# Altium PCB ISL6236A_DEMO_PCB_V1I1.PcbDoc (part 1 of 3)
Units mm, origin at the board's own origin, x right, y up, seen from the top; angles counter-clockwise.
Board outline 50 x 50 mm, 6 copper layers (L1, L2, L3, L4, L5, L6), stack 0.816 mm thick; 41 components, 27 nets, 119 pads, 41 vias.
Unrouted connection lines stored in the file: 91.
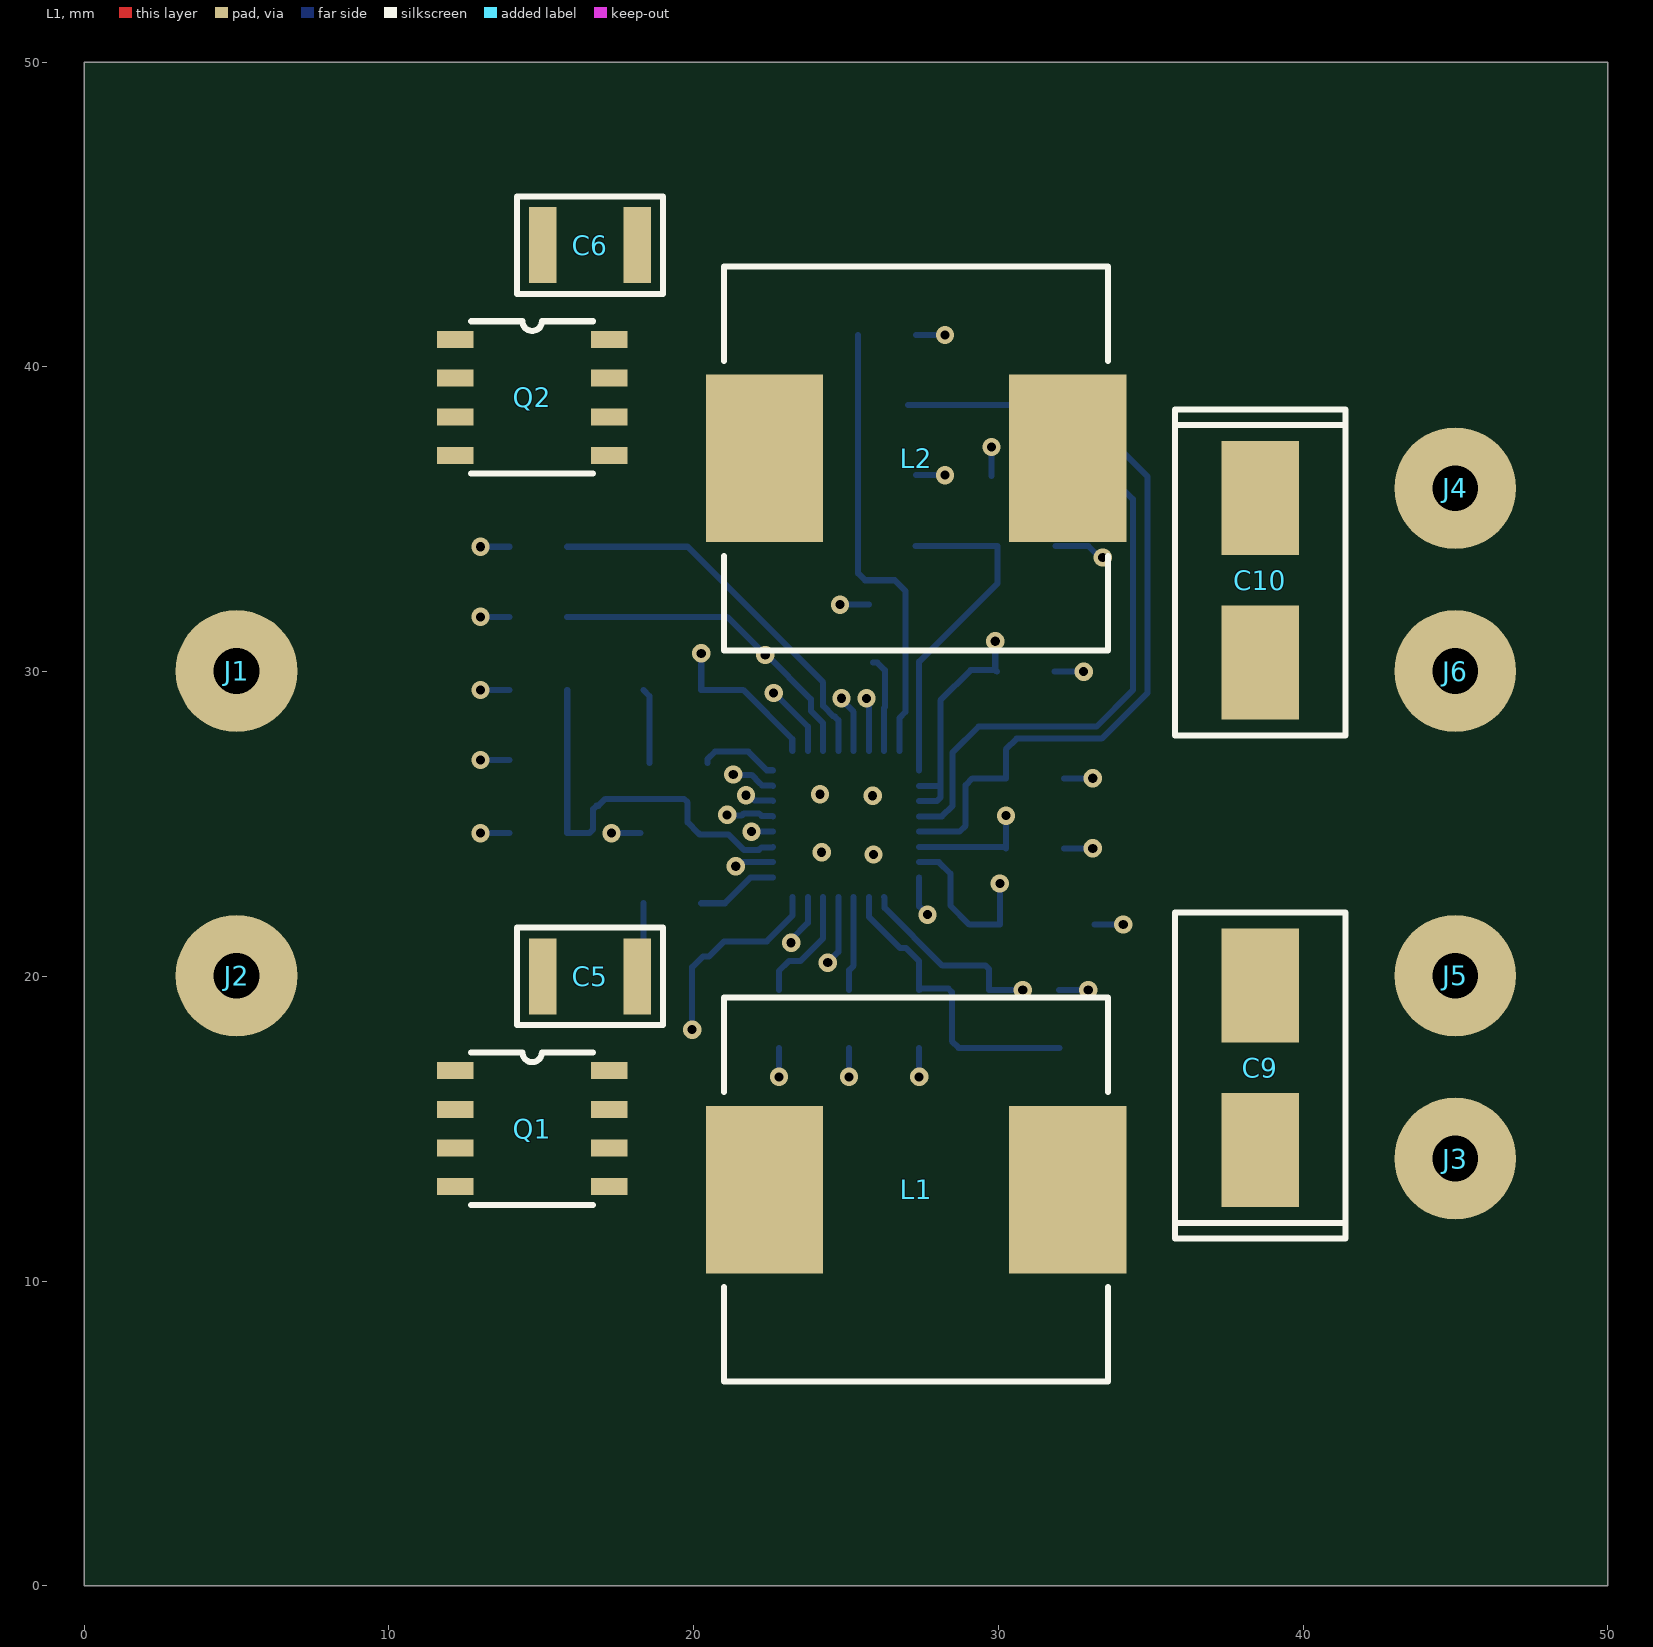
[diagram p0: L1 view]
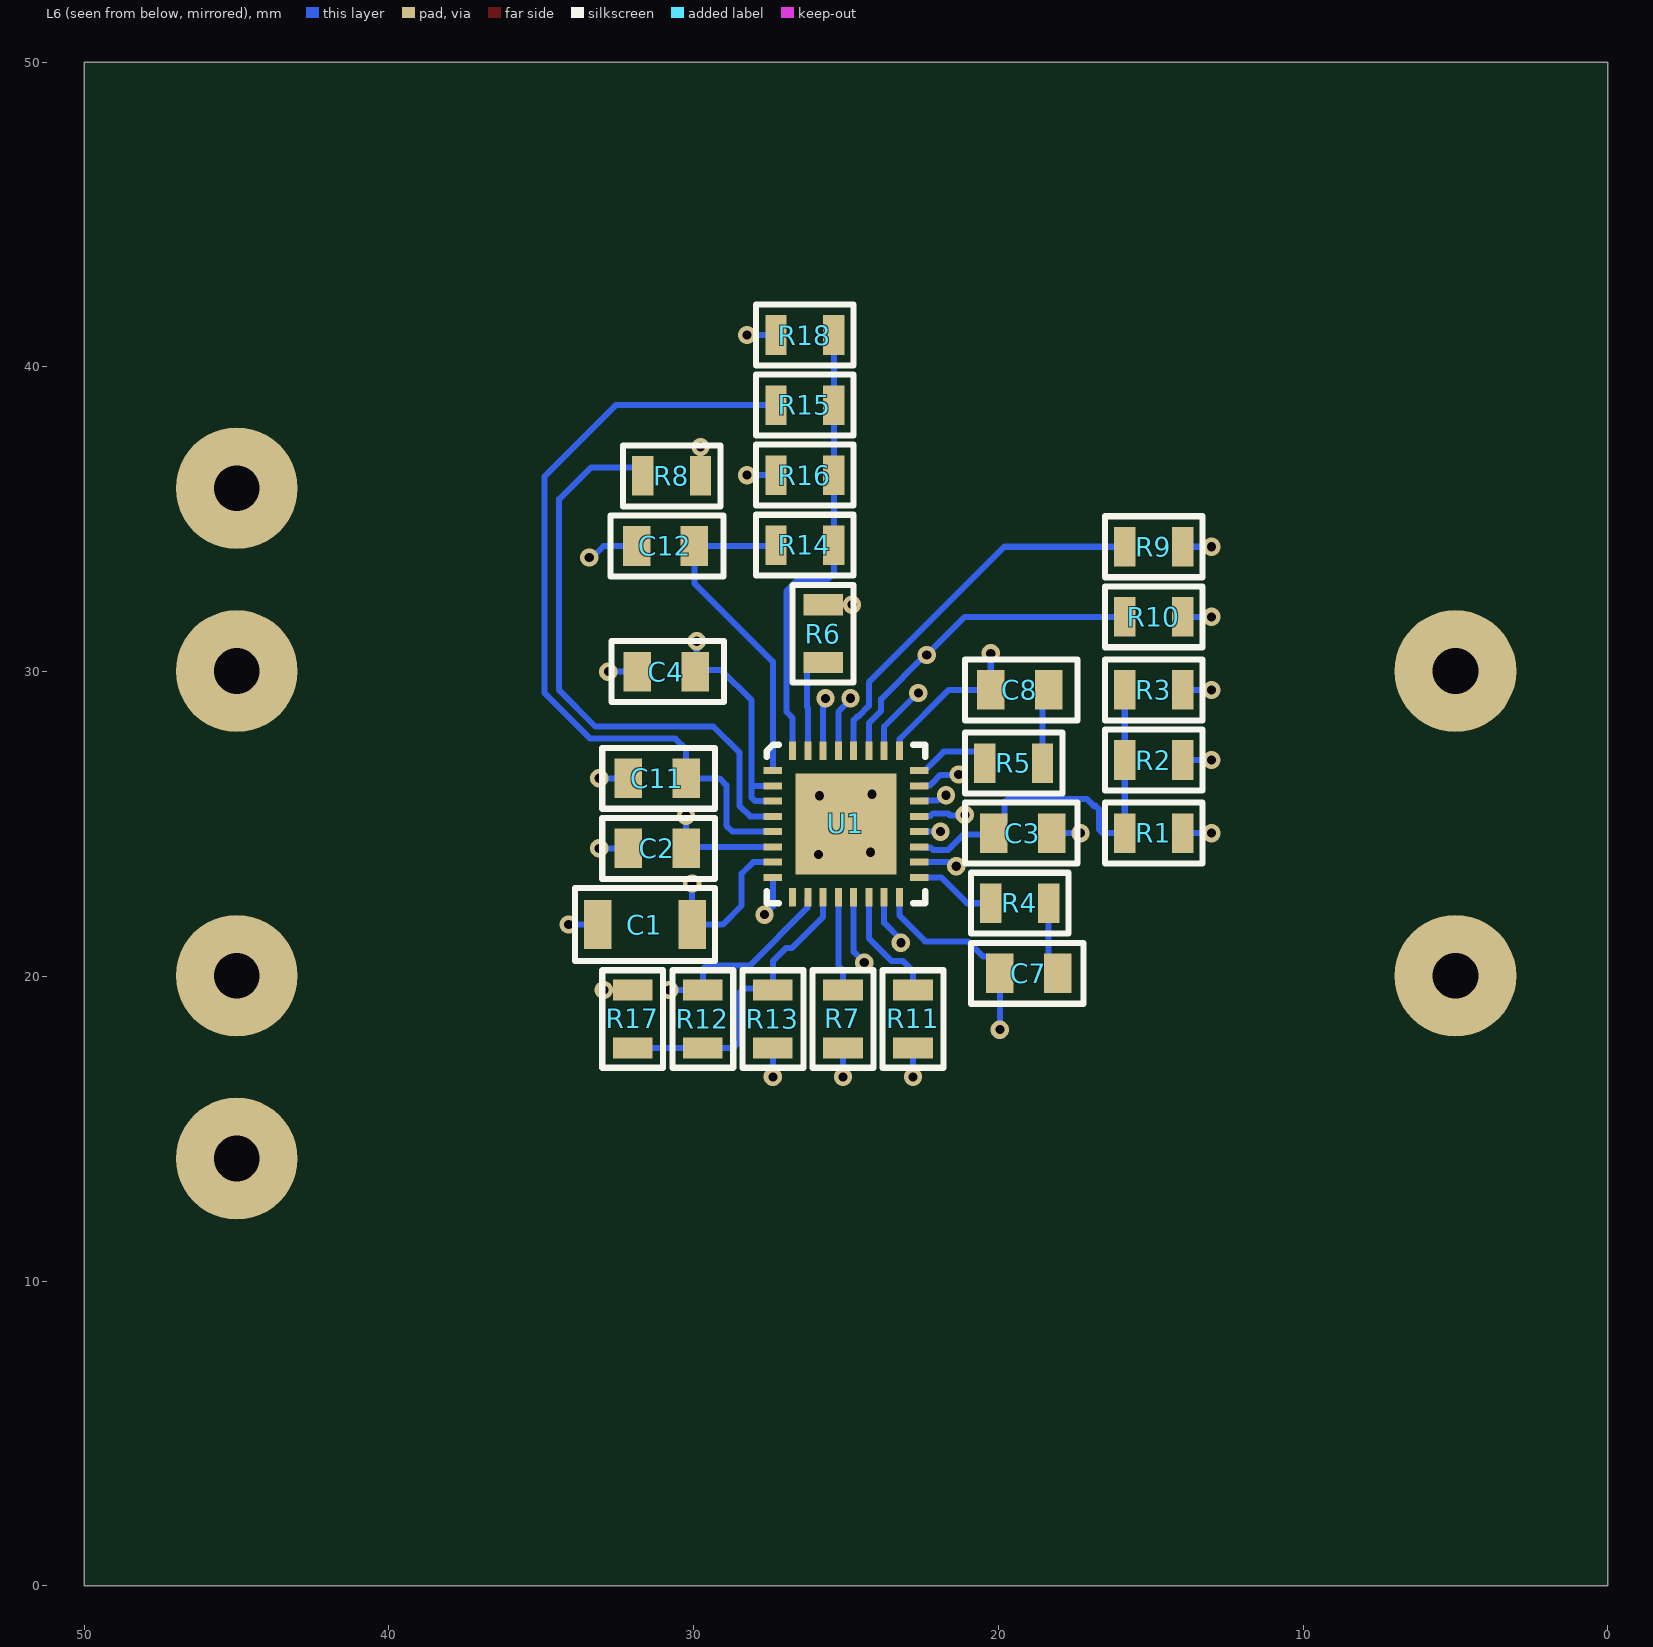
[diagram p1: L6 view, seen from below]
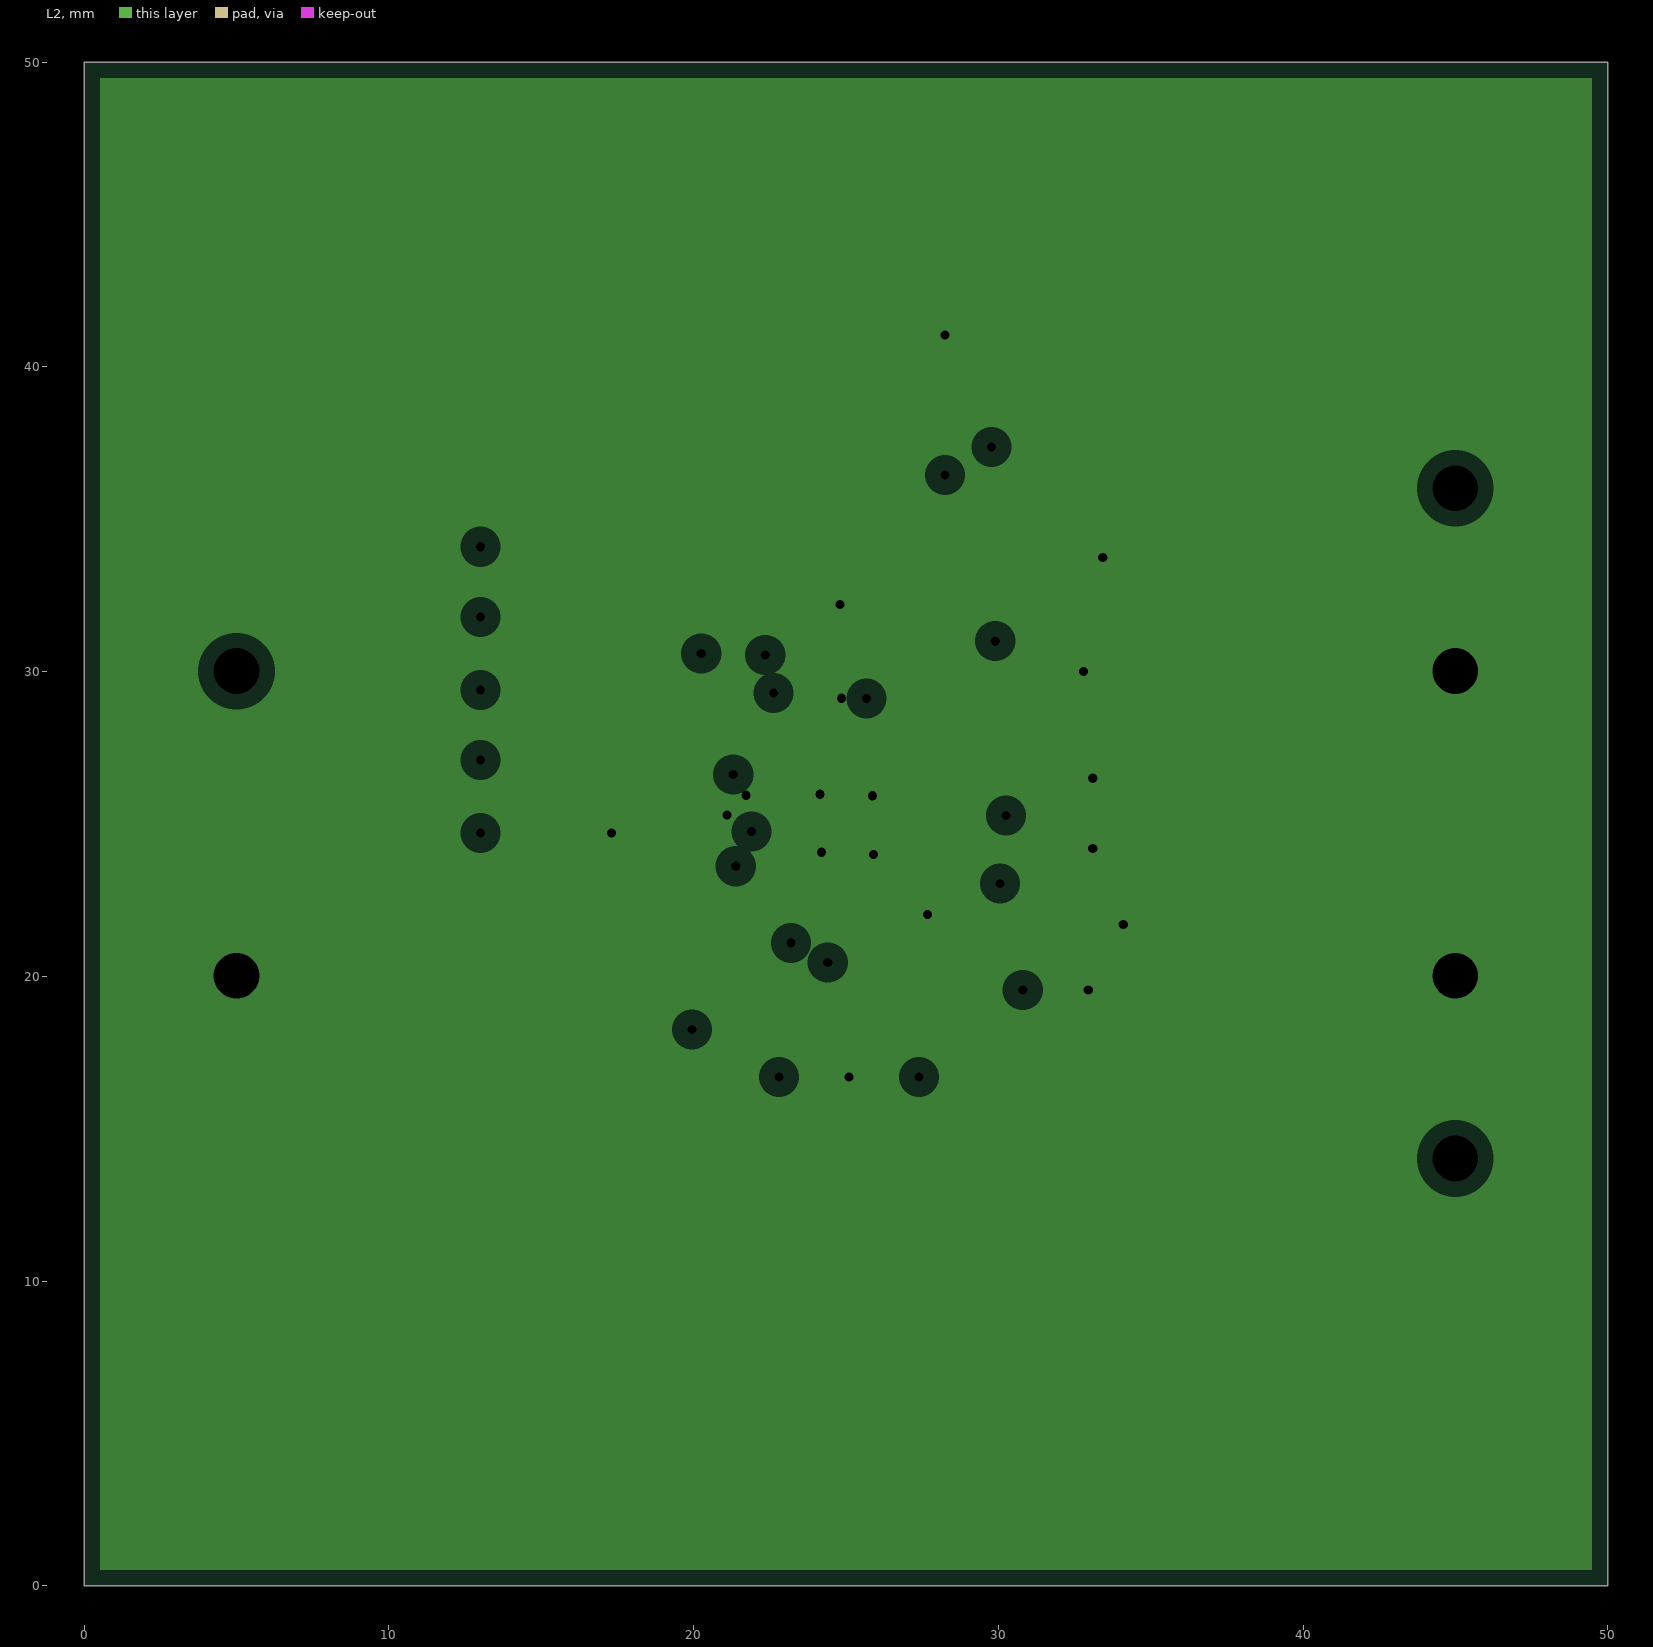
[diagram p2: L2, clearances drawn from the general rule]
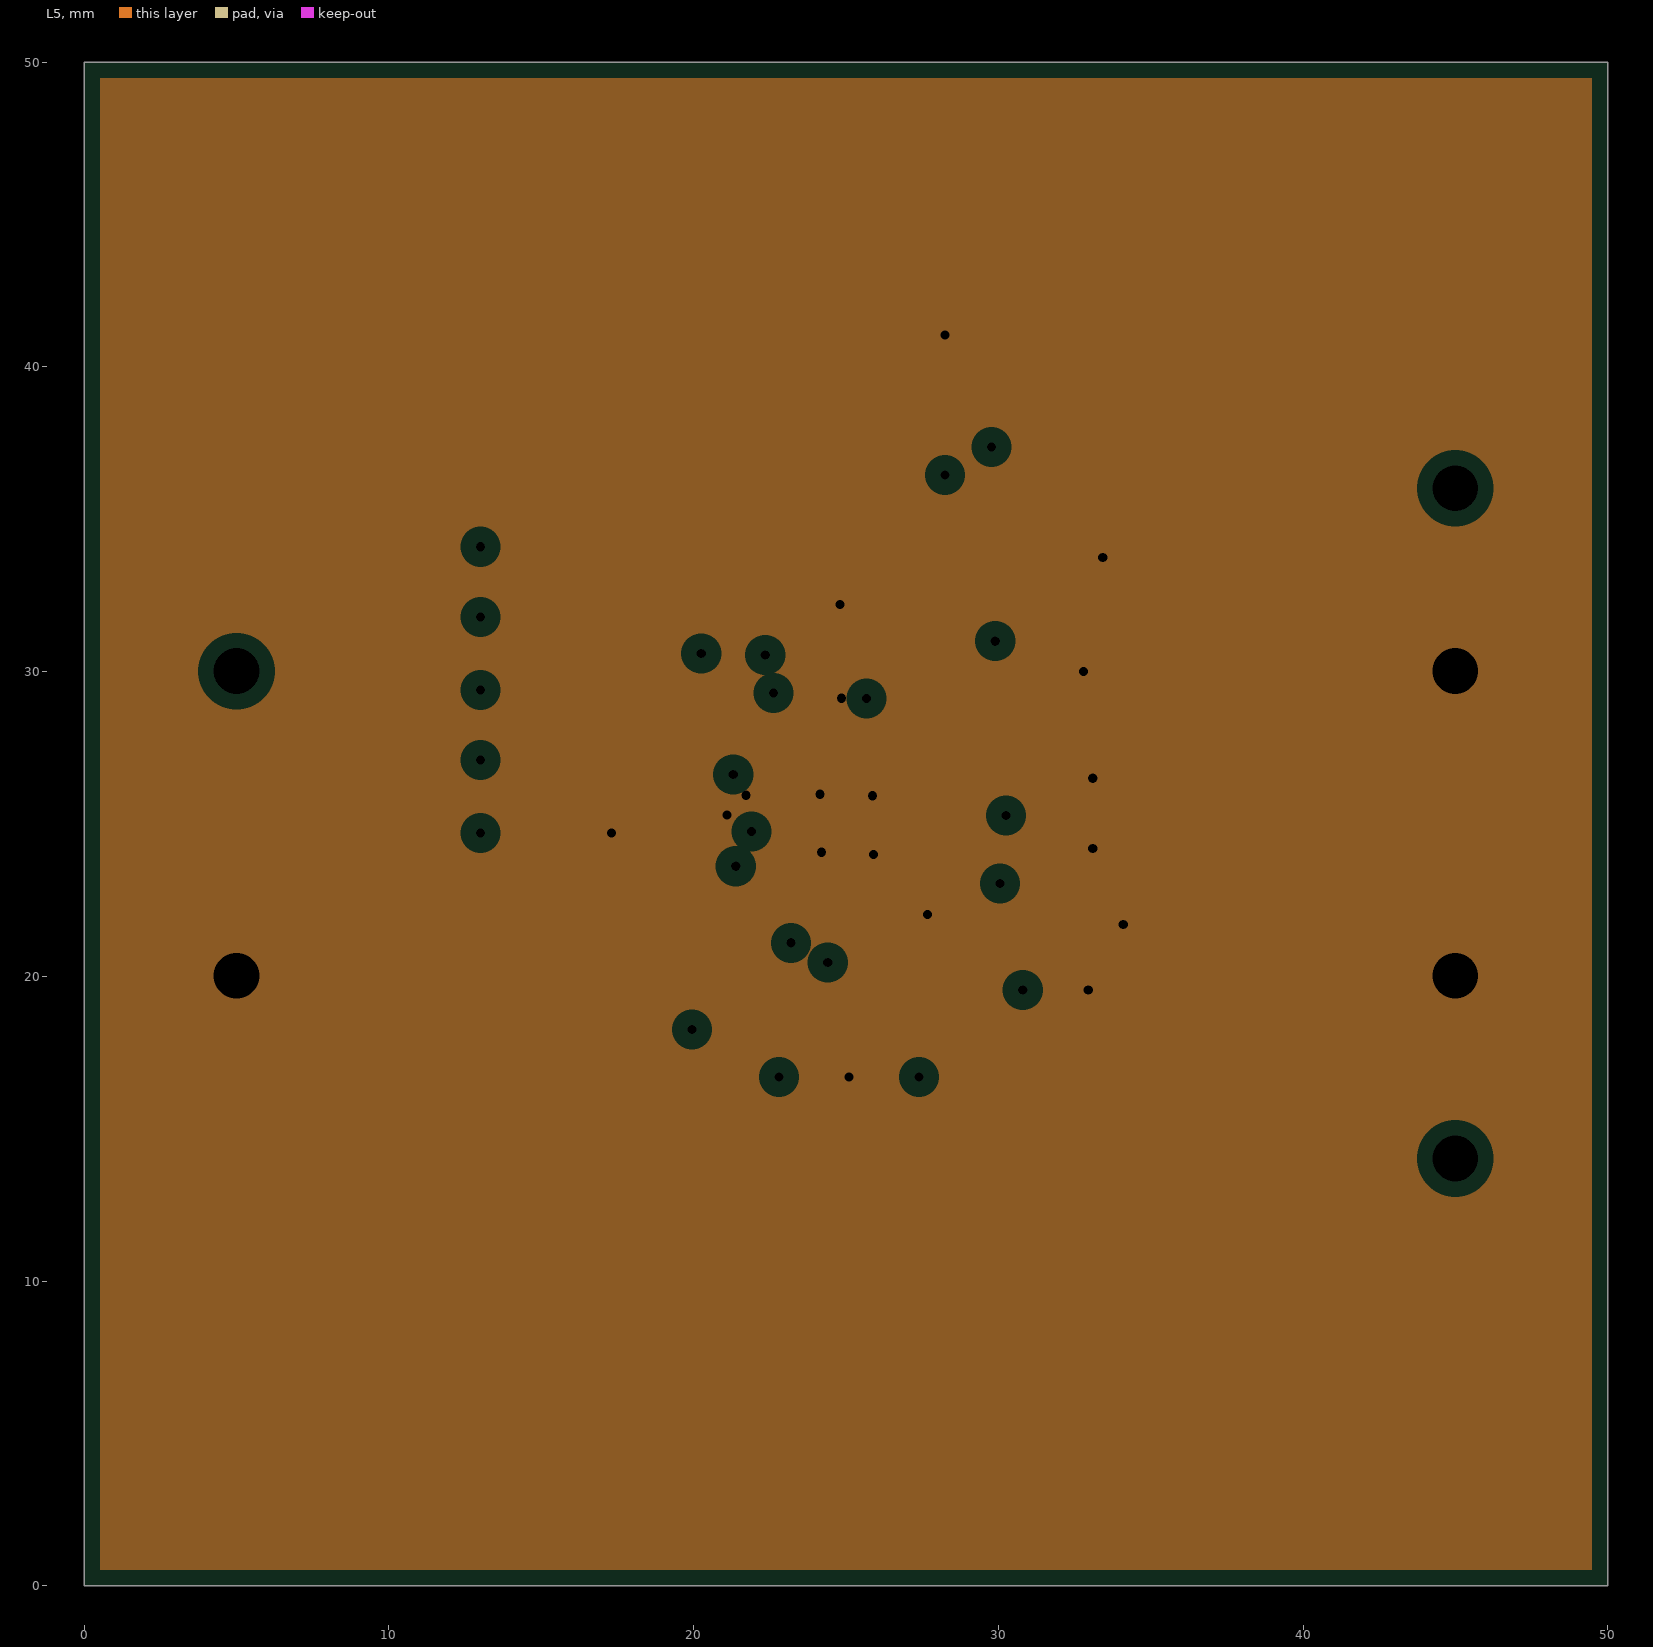
[diagram p3: L5, clearances drawn from the general rule]

## Layer stack, top to bottom
Top Solder: solder mask 0.0102, Solder Resist, Dk 3.5
L1: signal copper 0.0356
Dielectric 2: prepreg 0.0711, PP-006, Dk 4.1
L2: plane copper 0.035, net GND
Dielectric 3: prepreg 0.0711, PP-006, Dk 4.1
L3: signal copper 0.035
Dielectric 4: prepreg 0.0711, PP-006, Dk 4.1
L4: signal copper 0.035
Dielectric 5: prepreg 0.0711, PP-006, Dk 4.1
L5: plane copper 0.035, net GND
Dielectric 1: dielectric 0.32, FR-4, Dk 4.8
L6: signal copper 0.0356
Bottom Solder: solder mask 0.0102, Solder Resist, Dk 3.5

## Board outline
0,0 50,0 50,50 0,50

## Design rules (kind name [scope] priority, off if disabled: settings)
Clearance [All] p1: gap=0.2 ignorepadtopadclearanceinfootprint=FALSE
ComponentClearance [All] p1: gap=0.099 collisioncheckmode=3 verticalgap=0.099 showdistances=FALSE
MinimumSolderMaskSliver [All] p1: minsoldermaskwidth=0.1
PlaneClearance [All] p1: clearance=0.508
PlaneConnect [All] p1: planeconnectstyle=Relief reliefexpansion=0.508 reliefentries=4 reliefconductorwidth=0.254 reliefairgap=0.254
PolygonConnect [All] p1: connectstyle=Relief reliefconductorwidth=0.254 reliefentries=4 polygonreliefangle="90 Angle" airgapwidth=0.254
RoutingVias [All] p1: holewidth=0.3 width=0.6 viastyle="Through Hole" minholewidth=0.3 minwidth=0.6 maxholewidth=0.3 maxwidth=0.6
SilkToSolderMaskClearance [IsPad] p1: minsilkscreentomaskgap=0.1 clearancetoexposedcopper=TRUE
SolderMaskExpansion [All] p1: expansion=0.102 istentingtop=TRUE
SupplyNets "Schematic Supply Nets_6" [InNet('+1V05')] p1: voltage=0.000
SupplyNets "Schematic Supply Nets_5" [InNet('+5V_PVCC')] p2: voltage=0.000
SupplyNets "Schematic Supply Nets_4" [InNet('+5V_VCC')] p3: voltage=0.000
SupplyNets "Schematic Supply Nets_3" [InNet('+1V5')] p4: voltage=0.000
SupplyNets "Schematic Supply Nets_2" [InNet('+5V_LDO')] p5: voltage=0.000
SupplyNets "Schematic Supply Nets_1" [InNet('+VIN')] p6: voltage=0.000
SupplyNets "Schematic Supply Nets" [InNet('GND')] p7: voltage=0.000
Width [All] p1: maxlimit=10 minlimit=0.2 preferedwidth=0.2
25 further rules are at their usual default settings.

## Components (designator, comment, footprint, x,y, rotation, side; value= is the part's Value field where it differs from the comment)
C1 "4.7uF" C1206 31.6,21.7 r180 bottom value=4.7µF
C2 "1uF, 50V" C0805 31.2,24.2 r0 bottom value=1µF
C3 "1uF, 50V" C0805 19.2,24.7 r180 bottom value=1µF
C4 "1uF, 50V" C0805 30.9,30 r0 bottom value=1µF
C5 "10uF, 35V" C1210 16.6,20 r0 top value=10µF
C6 "10uF, 35V" C1210 16.6,44 r180 top value=10µF
C7 "100nF" C0805 19,20.1 r180 bottom
C8 "220nF" C0805 19.3,29.4 r0 bottom
C9 "330uF, 10V" 7343-43 38.6,17 r90 top value=330µF
C10 "330uF, 10V" 7343-43 38.6,33 r270 top value=330µF
C11 "10nf" C0805 31.2,26.5 r0 bottom value=10nF
C12 "100nF" C0805 30.925,34.125 r0 bottom
J1 "4MMx1.5MM" PCBComponent_1 5,30 r0 top
J2 "4MMx1.5MM" PCBComponent_1 5,20 r0 top
J3 "4MMx1.5MM" PCBComponent_1 45,14 r0 top
J4 "4MMx1.5MM" PCBComponent_1 45,36 r0 top
J5 "4MMx1.5MM" PCBComponent_1 45,20 r0 top
J6 "4MMx1.5MM" PCBComponent_1 45,30 r0 top
L1 "3u3, DR125-3R3-R" DR125 27.3,13 r180 top value=3.3µH
L2 "2u2, DR125-2R2-R" DR125 27.3,37 r0 top value=2.2µH
Q1 "SI4816BDY-T1-E3" SO-8 14.7,15 r0 top value=18.5mΩ
Q2 "SI4816BDY-T1-E3" SO-8 14.7,39 r0 top value=18.5mΩ
R1 "0R" R0805 14.9,24.7 r180 bottom value=0Ω
R2 "0R" R0805 14.9,27.1 r0 bottom value=0Ω
R3 "10R" R0805 14.9,29.4 r180 bottom value=10Ω
R4 "1R" R0805 19.3,22.4 r0 bottom value=1Ω
R5 "1R" R0805 19.5,27 r180 bottom value=1Ω
R6 "200K" R0805 25.75,31.25 r90 bottom value=200kΩ
R7 "200K" R0805 25.1,18.6 r90 bottom value=200kΩ
R8 "10K" R0805 30.725,36.425 r180 bottom value=10kΩ
R9 "200K" R0805 14.9,34.1 r180 bottom value=200kΩ
R10 "200K" R0805 14.9,31.8 r180 bottom value=200kΩ
R11 "10K" R0805 22.8,18.6 r270 bottom value=10kΩ
R12 "DNF" R0805 29.7,18.6 r90 bottom
R13 "0R" R0805 27.4,18.6 r270 bottom value=0Ω
R14 "DNF" R0805 26.35,34.15 r0 bottom
R15 "0R" R0805 26.35,38.75 r0 bottom value=0Ω
R16 "DNF" R0805 26.35,36.45 r0 bottom
R17 "DNF" R0805 32,18.6 r270 bottom
R18 "DNF" R0805 26.35,41.05 r180 bottom
U1 "ISL6236AIRZ" L32.5x5B 25,25 r180 bottom

## Footprints (in the part's own frame and the unit in brackets; to place one, negate y for a bottom-side part, rotate by r counter-clockwise, add the part's x,y. Pads: shape width x height; smd on the part's side, far side on the other; paste and mask are expansions set on the pad)
7343-43 [mm]
  rect 3.75x2.55 smd mask+0.1: 1(-2.7,0) 2(2.7,0)
  silkscreen extent -5.6,-2.8 5.1,2.8
C0805 [mm]
  rect 0.9x1.3 smd mask+0.1: 1(-0.95,0) 2(0.95,0)
  silkscreen extent -1.9,-1 1.8,1
C1206 [mm]
  rect 0.9x1.6 smd mask+0.1: 1(-1.55,0) 2(1.55,0)
  silkscreen extent -2.3,-1.2 2.3,1.2
C1210 [mm]
  rect 0.9x2.5 smd mask+0.1: 1(-1.55,0) 2(1.55,0)
  silkscreen extent -2.4,-1.6 2.4,1.6
DR125 [mm]
  rect 3.85x5.5 smd mask+0.1: 1(-4.975,0) 2(4.975,0)
  silkscreen extent -6.3,-6.3 6.3,6.3
L32.5x5B [mm]
  rect 0.6x0.23 smd mask+0.051: 1(-2.4,1.75) 2(-2.4,1.25) 3(-2.4,0.75) 4(-2.4,0.25) 5(-2.4,-0.25) 6(-2.4,-0.75) 7(-2.4,-1.25) 8(-2.4,-1.75) 17(2.4,-1.75) 18(2.4,-1.25) 19(2.4,-0.75) 20(2.4,-0.25) 21(2.4,0.25) 22(2.4,0.75) 23(2.4,1.25) 24(2.4,1.75)
  rect 0.23x0.6 smd mask+0.051: 9(-1.75,-2.4) 10(-1.25,-2.4) 11(-0.75,-2.4) 12(-0.25,-2.4) 13(0.25,-2.4) 14(0.75,-2.4) 15(1.25,-2.4) 16(1.75,-2.4) 25(1.75,2.4) 26(1.25,2.4) 27(0.75,2.4) 28(0.25,2.4) 29(-0.25,2.4) 30(-0.75,2.4) 31(-1.25,2.4) 32(-1.75,2.4)
  rect 3.3x3.3 smd mask+0.051: 33(0,0)
  silkscreen extent -2.6,-2.6 2.6,2.6
PCBComponent_1 [mm]
  round 4 hole 1.5 mask+0.1: 1(-0.003,0.019)
R0805 [mm]
  rect 0.7x1.3 smd mask+0.1: 1(-0.95,0) 2(0.95,0)
  silkscreen extent -1.6,-1 1.6,1
SO-8 [mm]
  rect 1.194x0.559 smd mask+0.1: 1(-2.527,1.905) 2(-2.527,0.635) 3(-2.527,-0.635) 4(-2.527,-1.905) 5(2.527,-1.905) 6(2.527,-0.635) 7(2.527,0.635) 8(2.527,1.905)
  silkscreen extent -2,-2.5 2,2.5

## Part data
C1: library part C3216X5R1H475K160AB, "C Series 1206 4.7 uF 50 V ±10 % Tolerance X5R SMT Multilayer Ceramic Capacitor", Case Code (Imperial)=1206, Case Code (Metric)=3216, Dielectric=X5R, Dielectric Material=Ceramic, Manufacturer=TDK, Manufacturer Lifecycle Status="PRODUCTION (NOT RECOMMENDED FOR NEW DESIGN)", Max Operating Temperature=85°C, Min Operating Temperature=-55°C, Supplier Part Number=445-5994-1-ND, Tolerance=10%, Voltage Rating=50V, Case/Package=1206, Category="Ceramic Capacitors", China RoHS=Compliant, ComponentLink1Description=https://datasheet.octopart.com:443/C3216X5R1H475K160AB-TDK-datasheet-175423548.pdf?src-supplier=IHS, ComponentLink1URL=https://datasheet.octopart.com:443/C3216X5R1H475K160AB-TDK-datasheet-175423548.pdf?src-supplier=IHS, ComponentLink2Description=https://datasheet.octopart.com:443/C3216X5R1H475K160AB-TDK-datasheet-151546523.pdf?src-supplier=TDK, ComponentLink2URL=https://datasheet.octopart.com:443/C3216X5R1H475K160AB-TDK-datasheet-151546523.pdf?src-supplier=TDK, ComponentLink3Description=https://datasheet.octopart.com/C3216X5R1H475K160AB-TDK-datasheet-41194876.pdf, ComponentLink3URL=https://datasheet.octopart.com/C3216X5R1H475K160AB-TDK-datasheet-41194876.pdf, ComponentLink4Description=https://datasheet.octopart.com:443/C3216X5R1H475K160AB-TDK-datasheet-10921857.pdf?src-supplier=Future+Electronics, ComponentLink4URL=https://datasheet.octopart.com:443/C3216X5R1H475K160AB-TDK-datasheet-10921857.pdf?src-supplier=Future+Electronics, Composition=Ceramic, Depth=1.6mm, Export Control Classification Number (ECCN) Code=EAR99, Harmonized Tariff Schedule (HTS) Code=8532.24.00.20, Height=1.6mm, Introduction Date=2012-08-21, Lead Free="Lead Free", Length=3.2mm, Lifecycle Status=NRND, Manufacturer Part Number=C3216X5R1H475K160AB, Material=Ceramic, Max Length=3.4mm, Max Width=1.8mm, Min Length=3mm, Min Width=1.4mm, Mounting Technology="Surface Mount", Number of Terminals=2, Packaging=Digi-Reel®, Pricing="1=0.82, 10=0.514, 50=0.3948, 100=0.358, 500=0.29602, 1000=0.27684 (USD)", REACH SVHC=Yes, RoHS=Compliant, Schedule B="8532240020, 8532240020|8532240020|8532240020|8532240020|8532240020", Stock=28419, Supplier=DigiKey, Termination=SMD/SMT, Voltage Rating (DC)=50V, Weight=16.187578mg, Width=1.6mm
C2 C3 C4: library part C2012X7R1H105K125AB, "C Series 0805 1 uF 50 V ±10% Tolerance X7R SMT Multilayer Ceramic Capacitor", Case Code (Imperial)=0805, Case Code (Metric)=2012, Dielectric=X7R, Dielectric Material=Ceramic, Manufacturer=TDK, Manufacturer Lifecycle Status=PRODUCTION, Manufacturer Package Identifier="0805 (2012 metric)", Max Operating Temperature=125°C, Min Operating Temperature=-55°C, Supplier Part Number=445-7547-1-ND, Tolerance=10%, Voltage Rating=50V, Case/Package=0805, Category="Ceramic Capacitors", China RoHS=Compliant, ComponentLink1Description=https://datasheet.octopart.com:443/C2012X7R1H105K125AB-TDK-datasheet-175423548.pdf?src-supplier=TME, ComponentLink1URL=https://datasheet.octopart.com:443/C2012X7R1H105K125AB-TDK-datasheet-175423548.pdf?src-supplier=TME, ComponentLink2Description=https://datasheet.octopart.com:443/C2012X7R1H105K125AB-TDK-datasheet-182135025.pdf?src-supplier=TME, ComponentLink2URL=https://datasheet.octopart.com:443/C2012X7R1H105K125AB-TDK-datasheet-182135025.pdf?src-supplier=TME, ComponentLink3Description=https://datasheet.octopart.com:443/C2012X7R1H105K125AB-TDK-datasheet-159617022.pdf?src-supplier=TME, ComponentLink3URL=https://datasheet.octopart.com:443/C2012X7R1H105K125AB-TDK-datasheet-159617022.pdf?src-supplier=TME, ComponentLink4Description=https://datasheet.octopart.com:443/C2012X7R1H105K125AB-TDK-datasheet-151546523.pdf?src-supplier=ODG+(Origin+Data+Global), ComponentLink4URL=https://datasheet.octopart.com:443/C2012X7R1H105K125AB-TDK-datasheet-151546523.pdf?src-supplier=ODG+(Origin+Data+Global), ComponentLink5Description=https://datasheet.octopart.com/C2012X7R1H105K125AB-TDK-datasheet-41194876.pdf, ComponentLink5URL=https://datasheet.octopart.com/C2012X7R1H105K125AB-TDK-datasheet-41194876.pdf, ComponentLink6Description=https://datasheet.octopart.com:443/C2012X7R1H105K125AB-TDK-datasheet-82475248.pdf?src-supplier=Newark, ComponentLink6URL=https://datasheet.octopart.com:443/C2012X7R1H105K125AB-TDK-datasheet-82475248.pdf?src-supplier=Newark, ComponentLink7Description=https://datasheet.octopart.com:443/C2012X7R1H105K125AB-TDK-datasheet-23766614.pdf?src-supplier=Newark, ComponentLink7URL=https://datasheet.octopart.com:443/C2012X7R1H105K125AB-TDK-datasheet-23766614.pdf?src-supplier=Newark, ComponentLink8Description=https://datasheet.octopart.com:443/C2012X7R1H105K125AB-TDK-datasheet-13444418.pdf?src-supplier=Newark, ComponentLink8URL=https://datasheet.octopart.com:443/C2012X7R1H105K125AB-TDK-datasheet-13444418.pdf?src-supplier=Newark, ComponentLink9Description=https://datasheet.octopart.com:443/C2012X7R1H105K125AB-TDK-datasheet-13376850.pdf?src-supplier=Newark, ComponentLink9URL=https://datasheet.octopart.com:443/C2012X7R1H105K125AB-TDK-datasheet-13376850.pdf?src-supplier=Newark, ComponentLink10Description=https://datasheet.octopart.com:443/C2012X7R1H105K125AB-TDK-datasheet-10978788.pdf?src-supplier=Newark, ComponentLink10URL=https://datasheet.octopart.com:443/C2012X7R1H105K125AB-TDK-datasheet-10978788.pdf?src-supplier=Newark, ComponentLink11Description=https://datasheet.octopart.com:443/C2012X7R1H105K125AB-TDK-datasheet-43729314.pdf?src-supplier=Electro+Sonic, ComponentLink11URL=https://datasheet.octopart.com:443/C2012X7R1H105K125AB-TDK-datasheet-43729314.pdf?src-supplier=Electro+Sonic, ComponentLink12Description=https://datasheet.octopart.com:443/C2012X7R1H105K125AB-TDK-datasheet-10921857.pdf?src-supplier=Future+Electronics, ComponentLink12URL=https://datasheet.octopart.com:443/C2012X7R1H105K125AB-TDK-datasheet-10921857.pdf?src-supplier=Future+Electronics, Composition=Ceramic, Depth=1.25mm, Height=1.25mm, Lead Free="Lead Free", Length=2mm, Lifecycle Status=Production, Manufacturer Part Number=C2012X7R1H105K125AB, Material=Ceramic, Max Length=2.2mm, Max Width=1.45mm, Min Length=1.8mm, Min Width=1.05mm, Mounting Technology="Surface Mount", Number of Terminals=2, Pins=2, Pricing="1=0.27, 10=0.158, 50=0.1146, 100=0.1011, 500=0.07844, 1000=0.07145 (USD)", Radiation Hardening=No, REACH SVHC=Yes, RoHS=Compliant, Schedule B="8532240020, 8532240020|8532240020|8532240020|8532240020|8532240020", Stock=33882, Supplier=DigiKey, Termination=SMD/SMT, Voltage Rating (DC)=50V, Weight=5.499807mg, Width=1.25mm
C5 C6: library part C1210C106K6PAC7210, "Ceramic Capacitor, Multilayer, Ceramic, 35V, 10% +Tol, 10% -Tol, X5R, 15% TC, 10uF, Surface Mount, 1210", Case/Package=1210, Dielectric=X5R, Dielectric Material=Ceramic, Manufacturer="Yageo Group", Max Operating Temperature=85°C, Min Operating Temperature=-55°C, Supplier Part Number=399-C1210C106K6PAC7210CT-ND, Tolerance=10%, Voltage Rating (DC)=35V, Category="Ceramic Capacitors", China RoHS=Compliant, ComponentLink1Description=https://datasheet.octopart.com:443/C1210C106K6PAC7210-KEMET-datasheet-178499189.pdf?src-supplier=IHS, ComponentLink1URL=https://datasheet.octopart.com:443/C1210C106K6PAC7210-KEMET-datasheet-178499189.pdf?src-supplier=IHS, ComponentLink2Description=https://datasheet.octopart.com/C1210C106K6PAC7210-KEMET-datasheet-84169754.pdf, ComponentLink2URL=https://datasheet.octopart.com/C1210C106K6PAC7210-KEMET-datasheet-84169754.pdf, Country of Origin=Mexico, Export Control Classification Number (ECCN) Code=EAR99, Harmonized Tariff Schedule (HTS) Code=8532.24.00.20, Height=1.9mm, Introduction Date=2016-03-30, Lead Free="Lead Free", Length=3.2mm, Lifecycle Status=Production, Manufacturer Part Number=C1210C106K6PAC7210, Mounting Technology="Surface Mount", Number of Terminals=2, Pricing="1=0.82, 10=0.514, 50=0.3946, 100=0.3578, 500=0.29584, 1000=0.27668 (USD)", REACH SVHC=Yes, RoHS=Compliant, Stock=7885, Supplier=DigiKey, Width=2.5mm
C7 C12: library part C0805X104K5RACTU, "Cap Ceramic 0.1uF 50V X7R 10% Pad SMD 0805 Flexible Termination 125C Automotive Medical T/R", Case Code (Imperial)=0805, Case Code (Metric)=2012, Dielectric=X7R, Dielectric Material=Ceramic, Manufacturer="Yageo Group", Manufacturer Package Identifier="0805 (2012 metric)", Max Operating Temperature=125°C, Min Operating Temperature=-55°C, Supplier Part Number=399-C0805X104K5RACTUCT-ND, Tolerance=10%, Voltage Rating=50V, Case/Package=0805, Category="Ceramic Capacitors", China RoHS=Compliant, ComponentLink1Description=https://datasheet.octopart.com:443/C0805X104K5RACTU-KEMET-datasheet-182040354.pdf?src-supplier=IHS, ComponentLink1URL=https://datasheet.octopart.com:443/C0805X104K5RACTU-KEMET-datasheet-182040354.pdf?src-supplier=IHS, ComponentLink2Description=https://datasheet.octopart.com:443/C0805X104K5RACTU-Kemet-datasheet-498967.pdf?src-supplier=Newark, ComponentLink2URL=https://datasheet.octopart.com:443/C0805X104K5RACTU-Kemet-datasheet-498967.pdf?src-supplier=Newark, ComponentLink3Description=https://datasheet.octopart.com:443/C0805X104K5RACTU-Kemet-datasheet-8764837.pdf?src-supplier=Newark, ComponentLink3URL=https://datasheet.octopart.com:443/C0805X104K5RACTU-Kemet-datasheet-8764837.pdf?src-supplier=Newark, ComponentLink4Description=https://datasheet.octopart.com:443/C0805X104K5RACTU-Kemet-datasheet-8480123.pdf?src-supplier=Newark, ComponentLink4URL=https://datasheet.octopart.com:443/C0805X104K5RACTU-Kemet-datasheet-8480123.pdf?src-supplier=Newark, ComponentLink5Description=https://datasheet.octopart.com:443/C0805X104K5RACTU-Kemet-datasheet-5313890.pdf?src-supplier=Newark, ComponentLink5URL=https://datasheet.octopart.com:443/C0805X104K5RACTU-Kemet-datasheet-5313890.pdf?src-supplier=Newark, ComponentLink6Description=https://datasheet.octopart.com:443/C0805X104K5RACTU-Kemet-datasheet-5390537.pdf?src-supplier=Newark, ComponentLink6URL=https://datasheet.octopart.com:443/C0805X104K5RACTU-Kemet-datasheet-5390537.pdf?src-supplier=Newark, ComponentLink7Description=https://datasheet.octopart.com:443/C0805X104K5RACTU-Kemet-datasheet-5393970.pdf?src-supplier=Newark, ComponentLink7URL=https://datasheet.octopart.com:443/C0805X104K5RACTU-Kemet-datasheet-5393970.pdf?src-supplier=Newark, ComponentLink8Description=https://datasheet.octopart.com:443/C0805X104K5RACTU-Kemet-datasheet-8502025.pdf?src-supplier=Newark, ComponentLink8URL=https://datasheet.octopart.com:443/C0805X104K5RACTU-Kemet-datasheet-8502025.pdf?src-supplier=Newark, ComponentLink9Description=https://datasheet.octopart.com:443/C0805X104K5RACTU-Kemet-datasheet-7541751.pdf?src-supplier=Newark, ComponentLink9URL=https://datasheet.octopart.com:443/C0805X104K5RACTU-Kemet-datasheet-7541751.pdf?src-supplier=Newark, ComponentLink10Description=https://datasheet.octopart.com:443/C0805X104K5RACTU-Kemet-datasheet-161801.pdf?src-supplier=Newark, ComponentLink10URL=https://datasheet.octopart.com:443/C0805X104K5RACTU-Kemet-datasheet-161801.pdf?src-supplier=Newark, ComponentLink11Description=https://datasheet.octopart.com:443/C0805X104K5RACTU-KEMET-datasheet-176142390.pdf?src-supplier=Newark, ComponentLink11URL=https://datasheet.octopart.com:443/C0805X104K5RACTU-KEMET-datasheet-176142390.pdf?src-supplier=Newark, ComponentLink12Description=https://datasheet.octopart.com:443/C0805X104K5RACTU-KEMET-datasheet-181958278.pdf?src-supplier=Farnell, ComponentLink12URL=https://datasheet.octopart.com:443/C0805X104K5RACTU-KEMET-datasheet-181958278.pdf?src-supplier=Farnell, ComponentLink13Description=https://datasheet.octopart.com:443/C0805X104K5RACTU-KEMET-datasheet-181958277.pdf?src-supplier=Farnell, ComponentLink13URL=https://datasheet.octopart.com:443/C0805X104K5RACTU-KEMET-datasheet-181958277.pdf?src-supplier=Farnell, ComponentLink14Description=https://datasheet.octopart.com:443/C0805X104K5RACTU-KEMET-datasheet-101576457.pdf?src-supplier=Farnell, ComponentLink14URL=https://datasheet.octopart.com:443/C0805X104K5RACTU-KEMET-datasheet-101576457.pdf?src-supplier=Farnell, ComponentLink15Description=https://datasheet.octopart.com:443/C0805X104K5RACTU-KEMET-datasheet-175423158.pdf?src-supplier=Farnell, ComponentLink15URL=https://datasheet.octopart.com:443/C0805X104K5RACTU-KEMET-datasheet-175423158.pdf?src-supplier=Farnell, ComponentLink16Description=https://datasheet.octopart.com:443/C0805X104K5RACTU-Kemet-datasheet-66093367.pdf?src-supplier=element14+APAC, ComponentLink16URL=https://datasheet.octopart.com:443/C0805X104K5RACTU-Kemet-datasheet-66093367.pdf?src-supplier=element14+APAC, ComponentLink17Description=https://datasheet.octopart.com:443/C0805X104K5RACTU-KEMET-datasheet-81638493.pdf?src-supplier=element14+APAC, ComponentLink17URL=https://datasheet.octopart.com:443/C0805X104K5RACTU-KEMET-datasheet-81638493.pdf?src-supplier=element14+APAC, ComponentLink18Description=https://datasheet.octopart.com:443/C0805X104K5RACTU-Kemet-datasheet-67167355.pdf?src-supplier=element14+APAC, ComponentLink18URL=https://datasheet.octopart.com:443/C0805X104K5RACTU-Kemet-datasheet-67167355.pdf?src-supplier=element14+APAC, ComponentLink19Description=https://datasheet.octopart.com:443/C0805X104K5RACTU-KEMET-datasheet-192294609.pdf?src-supplier=element14+APAC, ComponentLink19URL=https://datasheet.octopart.com:443/C0805X104K5RACTU-KEMET-datasheet-192294609.pdf?src-supplier=element14+APAC, ComponentLink20Description=https://datasheet.octopart.com:443/C0805X104K5RACTU-KEMET-datasheet-142166354.pdf?src-supplier=Electro+Sonic, ComponentLink20URL=https://datasheet.octopart.com:443/C0805X104K5RACTU-KEMET-datasheet-142166354.pdf?src-supplier=Electro+Sonic, ComponentLink21Description=https://datasheet.octopart.com:443/C0805X104K5RACTU-KEMET-datasheet-68331963.pdf?src-supplier=TME, ComponentLink21URL=https://datasheet.octopart.com:443/C0805X104K5RACTU-KEMET-datasheet-68331963.pdf?src-supplier=TME, ComponentLink22Description=https://datasheet.octopart.com:443/C0805X104K5RACTU-KEMET-datasheet-68322508.pdf?src-supplier=TME, ComponentLink22URL=https://datasheet.octopart.com:443/C0805X104K5RACTU-KEMET-datasheet-68322508.pdf?src-supplier=TME, ComponentLink23Description=https://datasheet.octopart.com/C0805X104K5RACTU-KEMET-datasheet-84169754.pdf, ComponentLink23URL=https://datasheet.octopart.com/C0805X104K5RACTU-KEMET-datasheet-84169754.pdf, ComponentLink24Description=https://datasheet.octopart.com:443/C0805X104K5RACTU-Kemet-datasheet-8837965.pdf?src-supplier=element14, ComponentLink24URL=https://datasheet.octopart.com:443/C0805X104K5RACTU-Kemet-datasheet-8837965.pdf?src-supplier=element14, Depth=1.25mm, Dissipation Factor=2.5%, Export Control Classification Number (ECCN) Code=EAR99, Features="Soft Termination", Harmonized Tariff Schedule (HTS) Code=8532.24.00.20, Height=780µm, Introduction Date=2016-01-11, Length=2mm, Lifecycle Status=Production, Manufacturer Part Number=C0805X104K5RACTU, Mounting Technology="Surface Mount", Number of Terminals=2, Packaging="Cut Tape", Pins=2, Pricing="1=0.37, 10=0.223, 50=0.1638, 100=0.1456, 500=0.11516, 1000=0.10575 (USD)", REACH SVHC=Yes, RoHS=Compliant, Schedule B="8532240020, 8532240020|8532240020, 8532240020|8532240020|8532240020, 8532240020|8532240020|8532240020|8532240020", Stock=78001, Supplier=DigiKey, Termination=SMD/SMT, Thickness=889µm, Voltage Rating (AC)=50V, Voltage Rating (DC)=50V, Width=1.25mm
C8: library part C0805C224K5RACTU, "50V 220nF X7R ±10% 0805 Multilayer Ceramic Capacitors MLCC - SMD/SMT ROHS", Case Code (Imperial)=0805, Dielectric=X7R, Dielectric Material=Ceramic, Manufacturer="Yageo Group", Max Operating Temperature=125°C, Min Operating Temperature=-55°C, Supplier Part Number=399-C0805C224K5RACTUCT-ND, Temperature Coefficient=30ppm/°C, Tolerance=10%, Voltage=50V, Case/Package=0805, Category="Ceramic Capacitors", China RoHS=Compliant, ComponentLink1Description=https://datasheet.octopart.com:443/C0805C224K5RACTU-KEMET-datasheet-178445679.pdf?src-supplier=IHS, ComponentLink1URL=https://datasheet.octopart.com:443/C0805C224K5RACTU-KEMET-datasheet-178445679.pdf?src-supplier=IHS, ComponentLink2Description=https://datasheet.octopart.com:443/C0805C224K5RAC7800-KEMET-datasheet-184793319.pdf?src-supplier=IHS, ComponentLink2URL=https://datasheet.octopart.com:443/C0805C224K5RAC7800-KEMET-datasheet-184793319.pdf?src-supplier=IHS, ComponentLink3Description=https://datasheet.octopart.com:443/C0805C224K5RACTU-Kemet-datasheet-5313890.pdf?src-supplier=Upverter, ComponentLink3URL=https://datasheet.octopart.com:443/C0805C224K5RACTU-Kemet-datasheet-5313890.pdf?src-supplier=Upverter, ComponentLink4Description=https://datasheet.octopart.com:443/C0805C224K5RACTU-KEMET-datasheet-68331921.pdf?src-supplier=Upverter, ComponentLink4URL=https://datasheet.octopart.com:443/C0805C224K5RACTU-KEMET-datasheet-68331921.pdf?src-supplier=Upverter, ComponentLink5Description=https://datasheet.octopart.com:443/C0805C224K5RACTU-KEMET-datasheet-137357759.pdf?src-supplier=Farnell, ComponentLink5URL=https://datasheet.octopart.com:443/C0805C224K5RACTU-KEMET-datasheet-137357759.pdf?src-supplier=Farnell, ComponentLink6Description=https://datasheet.octopart.com:443/C0805C224K5RACTU-Kemet-datasheet-12608295.pdf?src-supplier=Farnell, ComponentLink6URL=https://datasheet.octopart.com:443/C0805C224K5RACTU-Kemet-datasheet-12608295.pdf?src-supplier=Farnell, ComponentLink7Description=https://datasheet.octopart.com:443/C0805C224K5RACTU-Kemet-datasheet-11992184.pdf?src-supplier=Farnell, ComponentLink7URL=https://datasheet.octopart.com:443/C0805C224K5RACTU-Kemet-datasheet-11992184.pdf?src-supplier=Farnell, ComponentLink8Description=https://datasheet.octopart.com:443/C0805C224K5RACTU-Kemet-datasheet-10942409.pdf?src-supplier=Farnell, ComponentLink8URL=https://datasheet.octopart.com:443/C0805C224K5RACTU-Kemet-datasheet-10942409.pdf?src-supplier=Farnell, ComponentLink9Description=https://datasheet.octopart.com:443/C0805C224K5RACTU-Kemet-datasheet-10404442.pdf?src-supplier=Farnell, ComponentLink9URL=https://datasheet.octopart.com:443/C0805C224K5RACTU-Kemet-datasheet-10404442.pdf?src-supplier=Farnell, ComponentLink10Description=https://datasheet.octopart.com:443/C0805C224K5RACTU-KEMET-datasheet-101576247.pdf?src-supplier=Farnell, ComponentLink10URL=https://datasheet.octopart.com:443/C0805C224K5RACTU-KEMET-datasheet-101576247.pdf?src-supplier=Farnell, ComponentLink11Description=https://datasheet.octopart.com:443/C0805C224K5RACTU-KEMET-datasheet-176142328.pdf?src-supplier=Farnell, ComponentLink11URL=https://datasheet.octopart.com:443/C0805C224K5RACTU-KEMET-datasheet-176142328.pdf?src-supplier=Farnell, ComponentLink12Description=https://datasheet.octopart.com:443/C0805C224K5RACTU-Kemet-datasheet-503297.pdf?src-supplier=Farnell, ComponentLink12URL=https://datasheet.octopart.com:443/C0805C224K5RACTU-Kemet-datasheet-503297.pdf?src-supplier=Farnell, ComponentLink13Description=https://datasheet.octopart.com:443/C0805C224K5RACTU-KEMET-datasheet-32036385.pdf?src-supplier=Electro+Sonic, ComponentLink13URL=https://datasheet.octopart.com:443/C0805C224K5RACTU-KEMET-datasheet-32036385.pdf?src-supplier=Electro+Sonic, ComponentLink14Description=https://datasheet.octopart.com:443/C0805C224K5RACTU-KEMET-datasheet-176289652.pdf?src-supplier=Newark, ComponentLink14URL=https://datasheet.octopart.com:443/C0805C224K5RACTU-KEMET-datasheet-176289652.pdf?src-supplier=Newark, ComponentLink15Description=https://datasheet.octopart.com:443/C0805C224K5RACTU-KEMET-datasheet-130256537.pdf?src-supplier=Newark, ComponentLink15URL=https://datasheet.octopart.com:443/C0805C224K5RACTU-KEMET-datasheet-130256537.pdf?src-supplier=Newark, ComponentLink16Description=https://datasheet.octopart.com:443/C0805C224K5RACTU-Kemet-datasheet-8764837.pdf?src-supplier=Newark, ComponentLink16URL=https://datasheet.octopart.com:443/C0805C224K5RACTU-Kemet-datasheet-8764837.pdf?src-supplier=Newark, ComponentLink17Description=https://datasheet.octopart.com:443/C0805C224K5RACTU-Kemet-datasheet-8480123.pdf?src-supplier=Newark, ComponentLink17URL=https://datasheet.octopart.com:443/C0805C224K5RACTU-Kemet-datasheet-8480123.pdf?src-supplier=Newark, ComponentLink18Description=https://datasheet.octopart.com:443/C0805C224K5RACTU-Kemet-datasheet-5390537.pdf?src-supplier=Newark, ComponentLink18URL=https://datasheet.octopart.com:443/C0805C224K5RACTU-Kemet-datasheet-5390537.pdf?src-supplier=Newark, ComponentLink19Description=https://datasheet.octopart.com:443/C0805C224K5RACTU-Kemet-datasheet-5393970.pdf?src-supplier=Newark, ComponentLink19URL=https://datasheet.octopart.com:443/C0805C224K5RACTU-Kemet-datasheet-5393970.pdf?src-supplier=Newark, ComponentLink20Description=https://datasheet.octopart.com:443/C0805C224K5RACTU-Kemet-datasheet-8502025.pdf?src-supplier=Newark, ComponentLink20URL=https://datasheet.octopart.com:443/C0805C224K5RACTU-Kemet-datasheet-8502025.pdf?src-supplier=Newark, ComponentLink21Description=https://datasheet.octopart.com:443/C0805C224K5RACTU-Kemet-datasheet-7541751.pdf?src-supplier=Newark, ComponentLink21URL=https://datasheet.octopart.com:443/C0805C224K5RACTU-Kemet-datasheet-7541751.pdf?src-supplier=Newark, ComponentLink22Description=https://datasheet.octopart.com:443/C0805C224K5RACTU-Kemet-datasheet-161801.pdf?src-supplier=Newark, ComponentLink22URL=https://datasheet.octopart.com:443/C0805C224K5RACTU-Kemet-datasheet-161801.pdf?src-supplier=Newark, ComponentLink23Description=https://datasheet.octopart.com:443/C0805C224K5RACTU-KEMET-datasheet-164512540.pdf?src-supplier=TME, ComponentLink23URL=https://datasheet.octopart.com:443/C0805C224K5RACTU-KEMET-datasheet-164512540.pdf?src-supplier=TME, ComponentLink24Description=https://datasheet.octopart.com:443/C0805C224K5RACTU-KEMET-datasheet-68299312.pdf?src-supplier=TME, ComponentLink24URL=https://datasheet.octopart.com:443/C0805C224K5RACTU-KEMET-datasheet-68299312.pdf?src-supplier=TME, ComponentLink25Description=https://datasheet.octopart.com:443/C0805C224K5RACTU-KEMET-datasheet-68331906.pdf?src-supplier=TME, ComponentLink25URL=https://datasheet.octopart.com:443/C0805C224K5RACTU-KEMET-datasheet-68331906.pdf?src-supplier=TME, ComponentLink26Description=https://datasheet.octopart.com:443/C0805C224K5RAC7800-Kemet-datasheet-62098571.pdf?src-supplier=TME, ComponentLink26URL=https://datasheet.octopart.com:443/C0805C224K5RAC7800-Kemet-datasheet-62098571.pdf?src-supplier=TME, ComponentLink27Description=https://datasheet.octopart.com:443/C0805C224K5RAC7800-Kemet-datasheet-17577222.pdf?src-supplier=TME, ComponentLink27URL=https://datasheet.octopart.com:443/C0805C224K5RAC7800-Kemet-datasheet-17577222.pdf?src-supplier=TME, ComponentLink28Description=https://datasheet.octopart.com:443/C0805C224K5RACTU-KEMET-datasheet-110724412.pdf?src-supplier=RS+(Formerly+Allied+Electronics), ComponentLink28URL=https://datasheet.octopart.com:443/C0805C224K5RACTU-KEMET-datasheet-110724412.pdf?src-supplier=RS+(Formerly+Allied+Electronics), ComponentLink29Description=https://datasheet.octopart.com:443/C0805C224K5RACTU-Kemet-datasheet-464.pdf?src-supplier=RS+(Formerly+Allied+Electronics), ComponentLink29URL=https://datasheet.octopart.com:443/C0805C224K5RACTU-Kemet-datasheet-464.pdf?src-supplier=RS+(Formerly+Allied+Electronics), ComponentLink30Description=https://datasheet.octopart.com/C0805C224K5RACTU-KEMET-datasheet-84169754.pdf, ComponentLink30URL=https://datasheet.octopart.com/C0805C224K5RACTU-KEMET-datasheet-84169754.pdf, ComponentLink31Description=https://datasheet.octopart.com:443/C0805C224K5RACTU-Kemet-datasheet-22084244.pdf?src-supplier=element14+APAC, ComponentLink31URL=https://datasheet.octopart.com:443/C0805C224K5RACTU-Kemet-datasheet-22084244.pdf?src-supplier=element14+APAC, ComponentLink32Description=https://datasheet.octopart.com:443/C0805C224K5RACTU-Kemet-datasheet-11546808.pdf?src-supplier=Arrow+Electronics, ComponentLink32URL=https://datasheet.octopart.com:443/C0805C224K5RACTU-Kemet-datasheet-11546808.pdf?src-supplier=Arrow+Electronics, ComponentLink33Description=https://datasheet.octopart.com:443/C0805C224K5RAC7800-KEMET-datasheet-164857143.pdf?src-supplier=Burklin+Elektronik, ComponentLink33URL=https://datasheet.octopart.com:443/C0805C224K5RAC7800-KEMET-datasheet-164857143.pdf?src-supplier=Burklin+Elektronik, ComponentLink34Description=http://sigma.octopart.com:80/conflict_mineral_statement/Yageo-company-3.pdf?src-supplier=Compliance+Statements, ComponentLink34URL=http://sigma.octopart.com:80/conflict_mineral_statement/Yageo-company-3.pdf?src-supplier=Compliance+Statements, ComponentLink35Description=http://sigma.octopart.com:80/rohs_statement/Yageo-company-2.pdf?src-supplier=Compliance+Statements, ComponentLink35URL=http://sigma.octopart.com:80/rohs_statement/Yageo-company-2.pdf?src-supplier=Compliance+Statements, Country of Origin="Mainland China, Taiwan", Depth=1.25mm, Dissipation Factor=2.5%, Export Control Classification Number (ECCN) Code=EAR99, Harmonized Tariff Schedule (HTS) Code=8532.24.00.20, Height=1.25mm, Introduction Date=2011-08-12, Lead Free="Lead Free", Lead Pitch=750µm, Length=2mm, Lifecycle Status=Production, Manufacturer Part Number=C0805C224K5RACTU, Material=Ceramic, Mounting Technology="Surface Mount", Number of Terminals=2, Packaging="Cut Tape", Pins=2, Pricing="1=0.22, 10=0.127, 50=0.0906, 100=0.0795, 500=0.06094, 1000=0.05521 (USD)", Radiation Hardening=No, REACH SVHC=Yes, RoHS=Compliant, Schedule B="8532240020, 8532240020|8532240020, 8532240020|8532240020|8532240020, 8532240020|8532240020|8532240020|8532240020", Stock=396277, Supplier=DigiKey, Termination=SMD/SMT, Thickness=1.397mm, Voltage Rating=50V, Voltage Rating (DC)=50V, Width=1.25mm
C9 C10: library part T530X337M010ATE004, "Cap Tant Solid 330uF 10V X CASE 20% (7.3 X 4.3 X 4mm) SMD 7343-43 T/R", Case Code (Imperial)=2917, Case Code (Metric)=7343, ESR (Equivalent Series Resistance)=4mΩ, Leakage Current=330µA, Manufacturer="Yageo Group", Max Operating Temperature=125°C, Min Operating Temperature=-55°C, Ripple Current=2.05A, Supplier Part Number=399-10378-1-ND, Tolerance=20%, Voltage=10V, Case/Package=2917, Category="Tantalum Capacitors", China RoHS=Compliant, ComponentLink1Description=https://datasheet.octopart.com:443/T530X337M010ATE004-KEMET-datasheet-182062996.pdf?src-supplier=IHS, ComponentLink1URL=https://datasheet.octopart.com:443/T530X337M010ATE004-KEMET-datasheet-182062996.pdf?src-supplier=IHS, ComponentLink2Description=https://datasheet.octopart.com:443/T530X337M010ATE004-KEMET-datasheet-137404858.pdf?src-supplier=Upverter, ComponentLink2URL=https://datasheet.octopart.com:443/T530X337M010ATE004-KEMET-datasheet-137404858.pdf?src-supplier=Upverter, ComponentLink3Description=https://datasheet.octopart.com:443/T530X337M010ATE004-KEMET-datasheet-140124355.pdf?src-supplier=Farnell, ComponentLink3URL=https://datasheet.octopart.com:443/T530X337M010ATE004-KEMET-datasheet-140124355.pdf?src-supplier=Farnell, ComponentLink4Description=https://datasheet.octopart.com:443/T530X337M010ATE004-KEMET-datasheet-101579198.pdf?src-supplier=Farnell, ComponentLink4URL=https://datasheet.octopart.com:443/T530X337M010ATE004-KEMET-datasheet-101579198.pdf?src-supplier=Farnell, ComponentLink5Description=https://datasheet.octopart.com:443/T530X337M010ATE004-KEMET-datasheet-182017436.pdf?src-supplier=Farnell, ComponentLink5URL=https://datasheet.octopart.com:443/T530X337M010ATE004-KEMET-datasheet-182017436.pdf?src-supplier=Farnell, ComponentLink6Description=https://datasheet.octopart.com:443/T530X337M010ATE004-Kemet-datasheet-26568957.pdf?src-supplier=Newark, ComponentLink6URL=https://datasheet.octopart.com:443/T530X337M010ATE004-Kemet-datasheet-26568957.pdf?src-supplier=Newark, ComponentLink7Description=https://datasheet.octopart.com:443/T530X337M010ATE004-KEMET-datasheet-81638763.pdf?src-supplier=Newark, ComponentLink7URL=https://datasheet.octopart.com:443/T530X337M010ATE004-KEMET-datasheet-81638763.pdf?src-supplier=Newark, ComponentLink8Description=https://datasheet.octopart.com:443/T530X337M010ATE004-KEMET-datasheet-166081189.pdf?src-supplier=Newark, ComponentLink8URL=https://datasheet.octopart.com:443/T530X337M010ATE004-KEMET-datasheet-166081189.pdf?src-supplier=Newark, ComponentLink9Description=https://datasheet.octopart.com:443/T530X337M010ATE004-Kemet-datasheet-66325550.pdf?src-supplier=Newark, ComponentLink9URL=https://datasheet.octopart.com:443/T530X337M010ATE004-Kemet-datasheet-66325550.pdf?src-supplier=Newark, ComponentLink10Description=https://datasheet.octopart.com:443/T530X337M010ATE004-KEMET-datasheet-193588003.pdf?src-supplier=Newark, ComponentLink10URL=https://datasheet.octopart.com:443/T530X337M010ATE004-KEMET-datasheet-193588003.pdf?src-supplier=Newark, ComponentLink11Description=https://datasheet.octopart.com:443/T530X337M010ATE004-Kemet-datasheet-66533080.pdf?src-supplier=element14+APAC, ComponentLink11URL=https://datasheet.octopart.com:443/T530X337M010ATE004-Kemet-datasheet-66533080.pdf?src-supplier=element14+APAC, ComponentLink12Description=https://datasheet.octopart.com:443/T530X337M010ATE004-KEMET-datasheet-83562318.pdf?src-supplier=element14+APAC, ComponentLink12URL=https://datasheet.octopart.com:443/T530X337M010ATE004-KEMET-datasheet-83562318.pdf?src-supplier=element14+APAC, ComponentLink13Description=https://datasheet.octopart.com:443/T530X337M010ATE004-KEMET-datasheet-98355851.pdf?src-supplier=TME, ComponentLink13URL=https://datasheet.octopart.com:443/T530X337M010ATE004-KEMET-datasheet-98355851.pdf?src-supplier=TME, ComponentLink14Description=https://datasheet.octopart.com:443/T530X337M010ATE004-KEMET-datasheet-67697638.pdf?src-supplier=TME, ComponentLink14URL=https://datasheet.octopart.com:443/T530X337M010ATE004-KEMET-datasheet-67697638.pdf?src-supplier=TME, ComponentLink15Description=https://datasheet.octopart.com:443/T530X337M010ATE004-Kemet-datasheet-11837805.pdf?src-supplier=Arrow+Electronics, ComponentLink15URL=https://datasheet.octopart.com:443/T530X337M010ATE004-Kemet-datasheet-11837805.pdf?src-supplier=Arrow+Electronics, ComponentLink16Description=https://datasheet.octopart.com:443/T530X337M010ATE004-Kemet-datasheet-8047.pdf?src-supplier=RS+(Formerly+Allied+Electronics), ComponentLink16URL=https://datasheet.octopart.com:443/T530X337M010ATE004-Kemet-datasheet-8047.pdf?src-supplier=RS+(Formerly+Allied+Electronics), Depth=4.3mm, Dissipation Factor=8%, Features="General Purpose", Height=4mm, Height - Seated (Max)=4.2926mm, Length=7.3mm, Life (Hours)=2000hours, Lifecycle Status=Production, Manufacturer Part Number=T530X337M010ATE004, Mounting Technology="Surface Mount", Number of Terminals=2, Packaging="Cut Tape", Polarity=Polar, Pricing="1=9.26, 10=6.976, 50=6.0632, 100=5.7807 (USD)", REACH SVHC=Yes, RoHS=Compliant, Schedule B="8532210050, 8532210050|8532210050|8532210050|8532210050|8532210050", Stock=14063, Supplier=DigiKey, Termination=SMD/SMT, Voltage Rating=10V, Voltage Rating (DC)=10V, Width=4.3mm